# EAGLE board LEVEL 3 TASK 1 (EAGLE 9.7.0)

Size 413.55 x 290.46 mm. Coordinates in mm from the lower left corner, seen from the top.
Outline: 0,0 413.56,0 413.56,290.46 0,290.46 0,0
Copper layers (1*16): Top 0.035mm / dielectric 1.5mm / Bottom 0.035mm
Design rules "default": minimum track width 6mil, minimum drill 0.35mm, track to track 6mil, track to pad 6mil, pad to pad 6mil, via to via 6mil, smd to smd 6mil, copper to edge 40mil, drill to drill 6mil, minimum pad ring 10mil, minimum via ring 8mil, stop-mask expansion 4mil, vias tented up to drill 0mil, thermal gap 10mil

## Footprints (pad centres in the part's own frame; a part is rotated, then mirrored left to right if it is on the bottom)
BATTERY-GENERIC = drill 1.118 pad 3.15 octagon: + 2.54,0; - -2.54,0
HC-SR04 = drill 1.016 long: 1 -3.81,0; 2 -1.27,0; 3 1.27,0; 4 3.81,0
DG01D = drill 1.118 pad 3.15 octagon: + 2.54,0; - -2.54,0
PIEZO = drill 1 pad 1.6: 1 -3.5,0; 2 3.5,0
LCD-I2C = drill 1.016 long: 1 -19.05,-5.08; 2 -19.05,-7.62; 3 -19.05,-10.16; 4 -19.05,-12.7
ARDUINO-UNO-R3-SHIELD = drill 1.016 pad 1.88: 3.3V 24.13,-2.54; 5V 24.13,0; A0 24.13,12.7; A1 24.13,15.24; A2 24.13,17.78; A3 24.13,20.32; A4 24.13,22.86; A5 24.13,25.4; AREF -24.13,-13.97; D2 -24.13,20.32; D3 -24.13,17.78; D4 -24.13,15.24; D5 -24.13,12.7; D6 -24.13,10.16; D7 -24.13,7.62; D8 -24.13,3.81; D9 -24.13,1.27; D10 -24.13,-1.27; D11 -24.13,-3.81; D12 -24.13,-6.35; D13 -24.13,-8.89; GND@0 24.13,2.54; GND@1 24.13,5.08; GND@2 -24.13,-11.43; IOREF 24.13,-7.62; NC 24.13,-10.16; RES 24.13,-5.08; RX -24.13,25.4; SCL -24.13,-19.05; SDA -24.13,-16.51; TX -24.13,22.86; VIN 24.13,7.62
DIP762W53P254L1969H508Q16B = drill 0.743 pad 1.343: 1 -3.81,8.89; 2 -3.81,6.35; 3 -3.81,3.81; 4 -3.81,1.27; 5 -3.81,-1.27; 6 -3.81,-3.81; 7 -3.81,-6.35; 8 -3.81,-8.89; 9 3.81,-8.89; 10 3.81,-6.35; 11 3.81,-3.81; 12 3.81,-1.27; 13 3.81,1.27; 14 3.81,3.81; 15 3.81,6.35; 16 3.81,8.89

## Placement (x,y rotation side)
BAT1  9V  [BATTERY-GENERIC]  386.98,200.86 270 top
DIST1  DISTANCE-SENSOR-4PINHC-SR04  [HC-SR04]  80.35,23.04 0 top
DIST2  DISTANCE-SENSOR-4PINHC-SR04  [HC-SR04]  150.87,22.23 0 top
M1  MOTOR_DG01D  [DG01D]  332.47,277.76 90 top
M2  MOTOR_DG01D  [DG01D]  339.26,150.03 90 top
PIEZO1  PIEZO  [PIEZO]  114.58,96.75 0 top
U1  LCD-16X2-I2CSUNFOUNDER-IIC  [LCD-I2C]  126.19,194.59 0 top
U2  ARDUINO-UNO-R3-SHIELD  [ARDUINO-UNO-R3-SHIELD]  47.88,170.72 270 top
U3  L293E  [DIP762W53P254L1969H508Q16B]  355.04,184.09 90 top

## Library data of the parts
BAT1 DIST1 DIST2 M1 M2 PIEZO1 U1-U3 = Tinkercad

## Nets
BAT1+: BAT1.+ U3.8
BAT1-: BAT1.- DIST1.4 DIST2.4 PIEZO1.2 U1.1 U2.GND@0 U2.GND@1 U2.GND@2 U3.4 U3.5 U3.12 U3.13
M1_+: M1.+ U3.14
M1_-: M1.- U3.11
M2_+: M2.+ U3.3
M2_-: M2.- U3.6
U2_5V: DIST1.1 DIST2.1 U1.2 U2.5V U3.16
U2_A0: DIST1.2 U2.A0
U2_A1: DIST1.3 U2.A1
U2_A2: DIST2.2 U2.A2
U2_A3: DIST2.3 U2.A3
U2_A4: U1.3 U2.A4
U2_A5: U1.4 U2.A5
U2_D2: PIEZO1.1 U2.D2
U2_D4: U2.D4 U3.2
U2_D5: U2.D5 U3.9
U2_D6: U2.D6 U3.1
U2_D7: U2.D7 U3.7
U2_D8: U2.D8 U3.15
U2_D12: U2.D12 U3.10

## Tracks (layer width: path | path; a pad name or v marks a point on that pad's centre or on a via)
BAT1+  (1 unrouted)
BAT1-  (11 unrouted)
M1_+  (1 unrouted)
M1_-  (1 unrouted)
M2_+  (1 unrouted)
M2_-  (1 unrouted)
U2_5V  (4 unrouted)
U2_A0  (1 unrouted)
U2_A1  (1 unrouted)
U2_A2  (1 unrouted)
U2_A3  (1 unrouted)
U2_A4  (1 unrouted)
U2_A5  (1 unrouted)
U2_D2  (1 unrouted)
U2_D4  (1 unrouted)
U2_D5  (1 unrouted)
U2_D6  (1 unrouted)
U2_D7  (1 unrouted)
U2_D8  (1 unrouted)
U2_D12  (1 unrouted)